# Altium PCB ABPG.PcbDoc
Units mm, origin at the board's own origin, x right, y up, seen from the top; angles counter-clockwise.
Board outline 62 x 60 mm, 4 copper layers (Top Layer, Layer 1, Layer 2, Bottom Layer), stack 0.603 mm thick; 85 components, 38 nets, 260 pads, 505 vias.
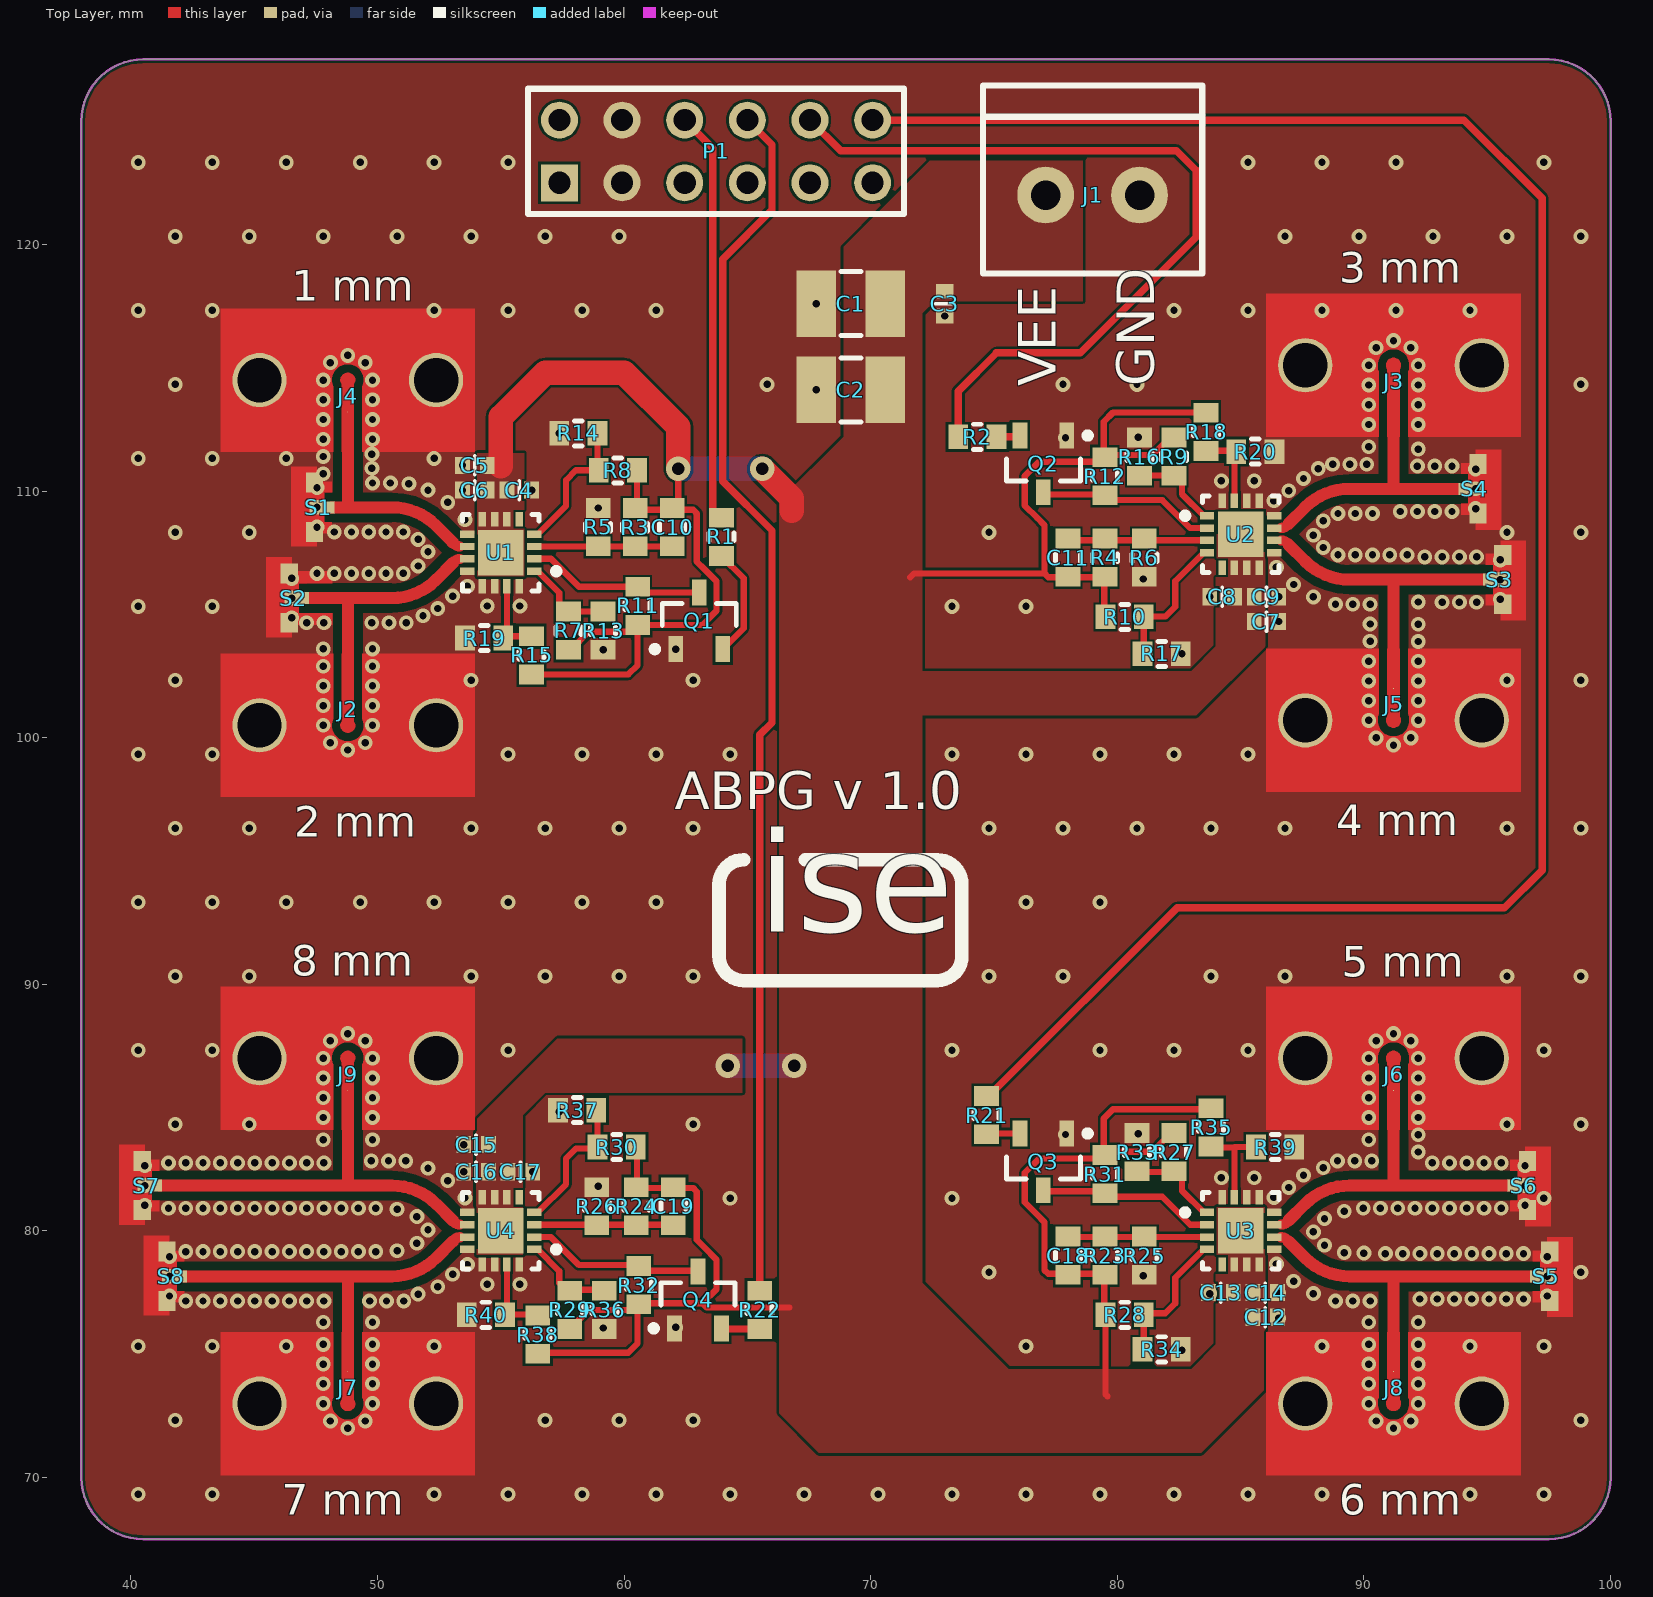
[diagram p0: Top Layer view]
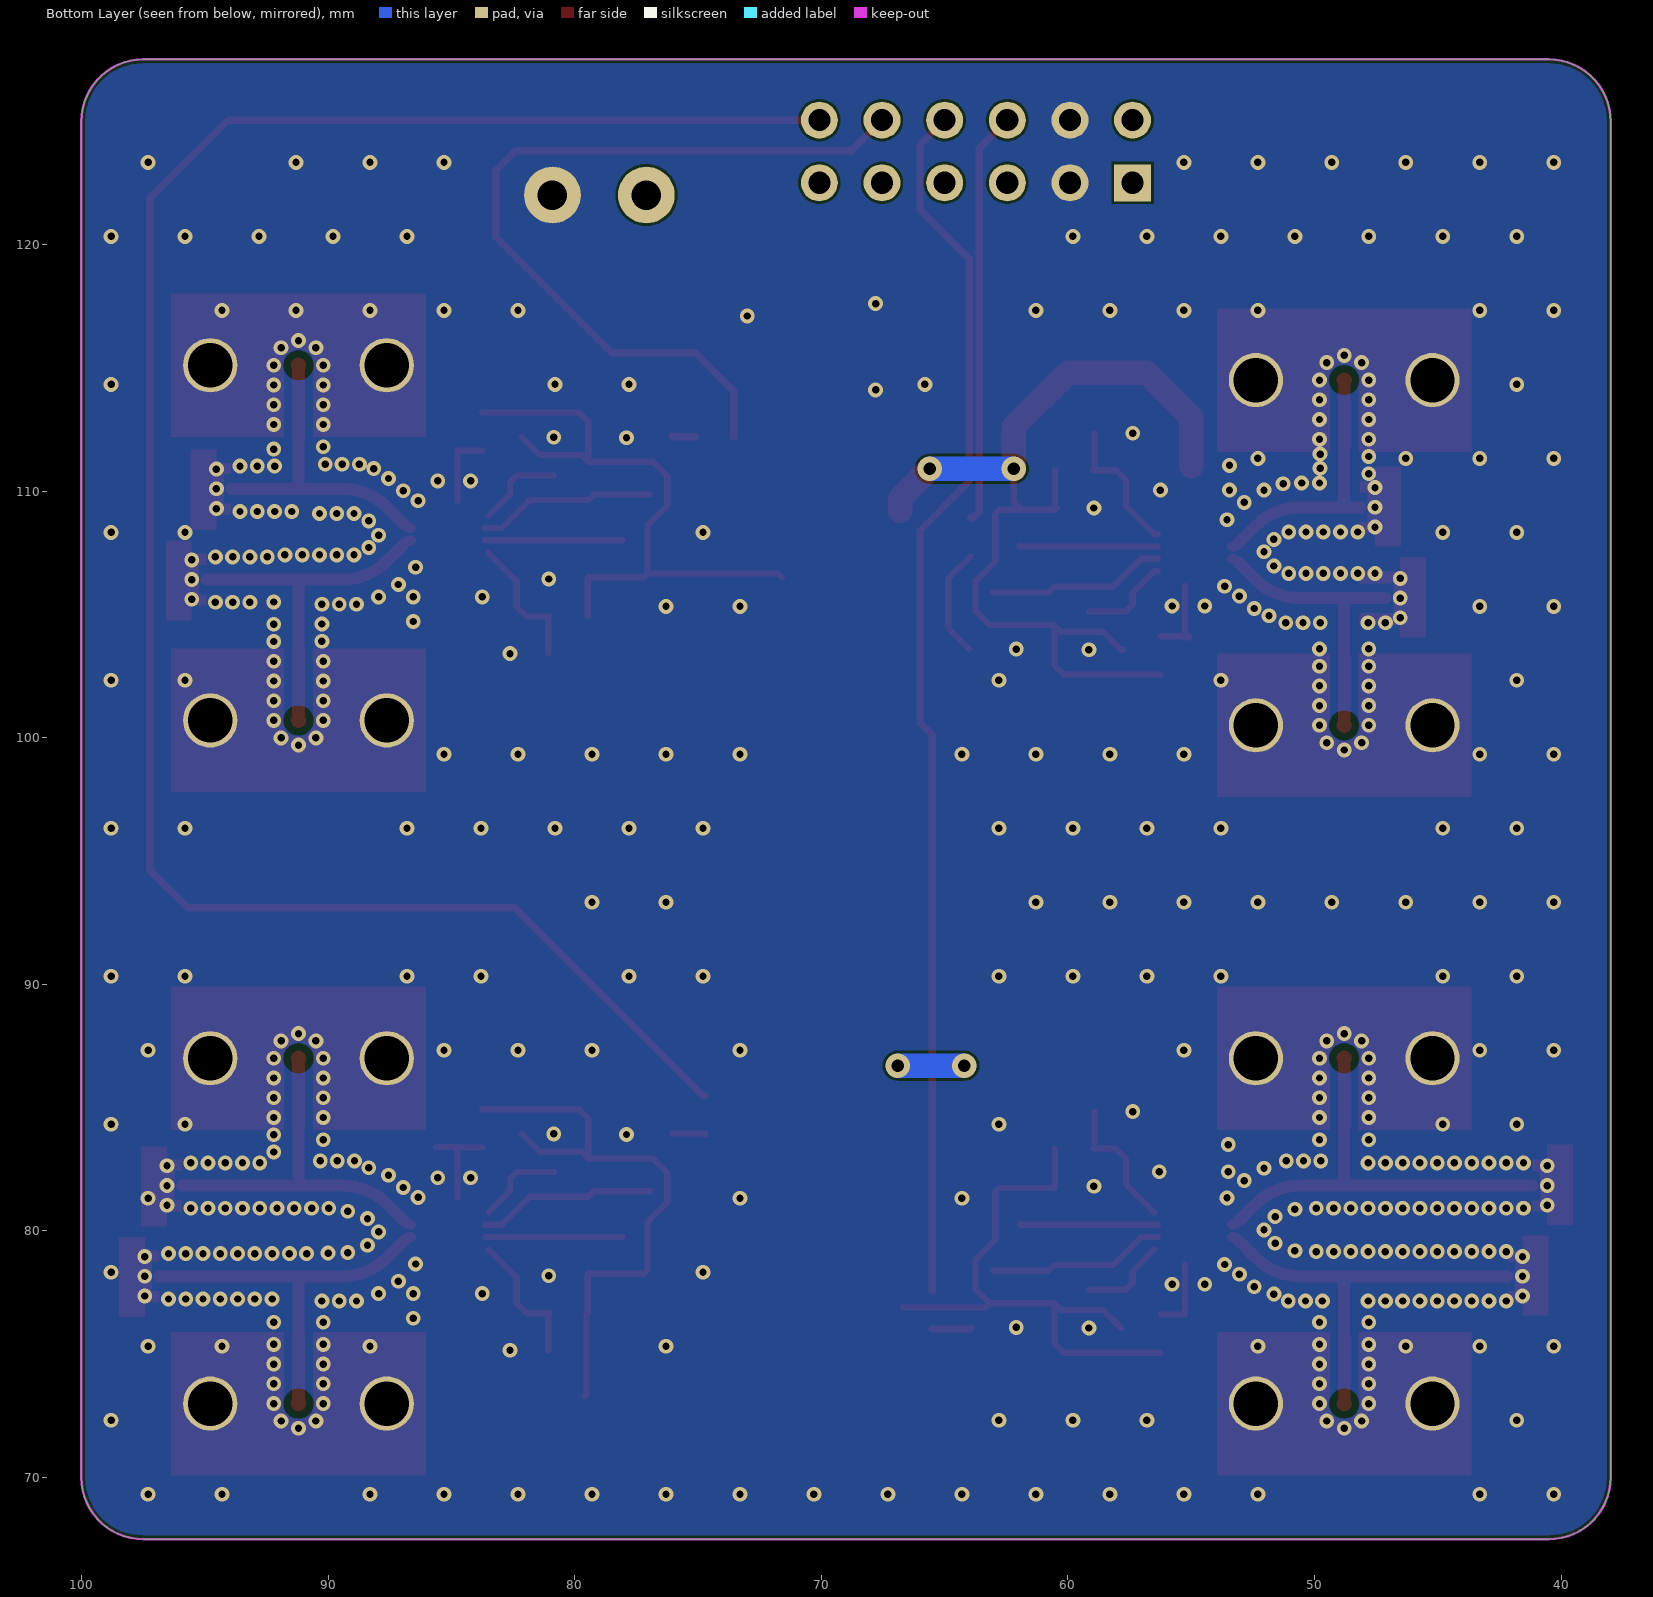
[diagram p1: Bottom Layer view, seen from below]
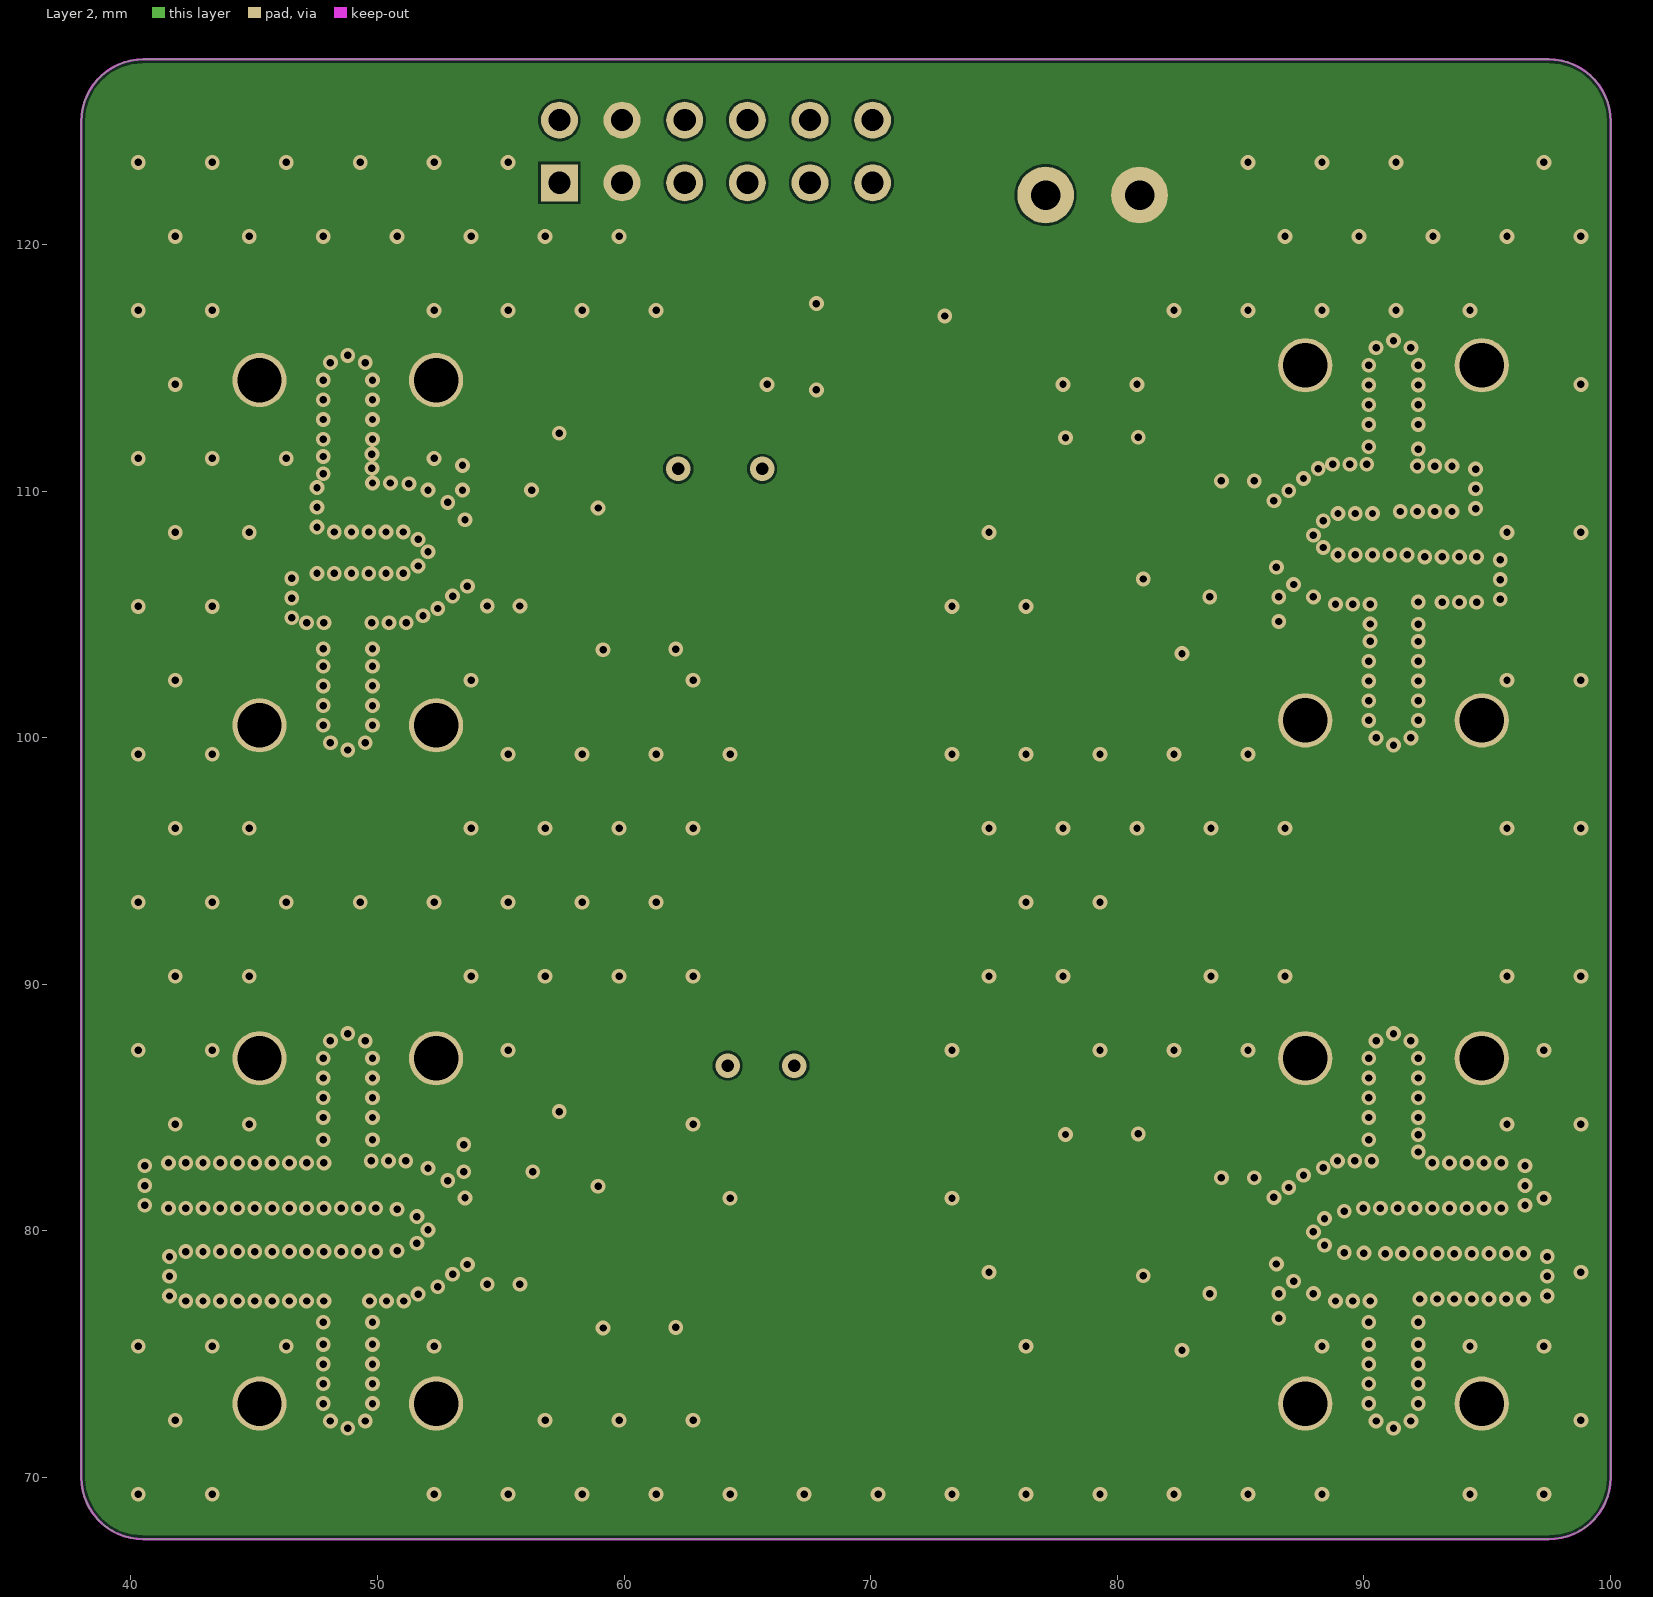
[diagram p2: Layer 2]
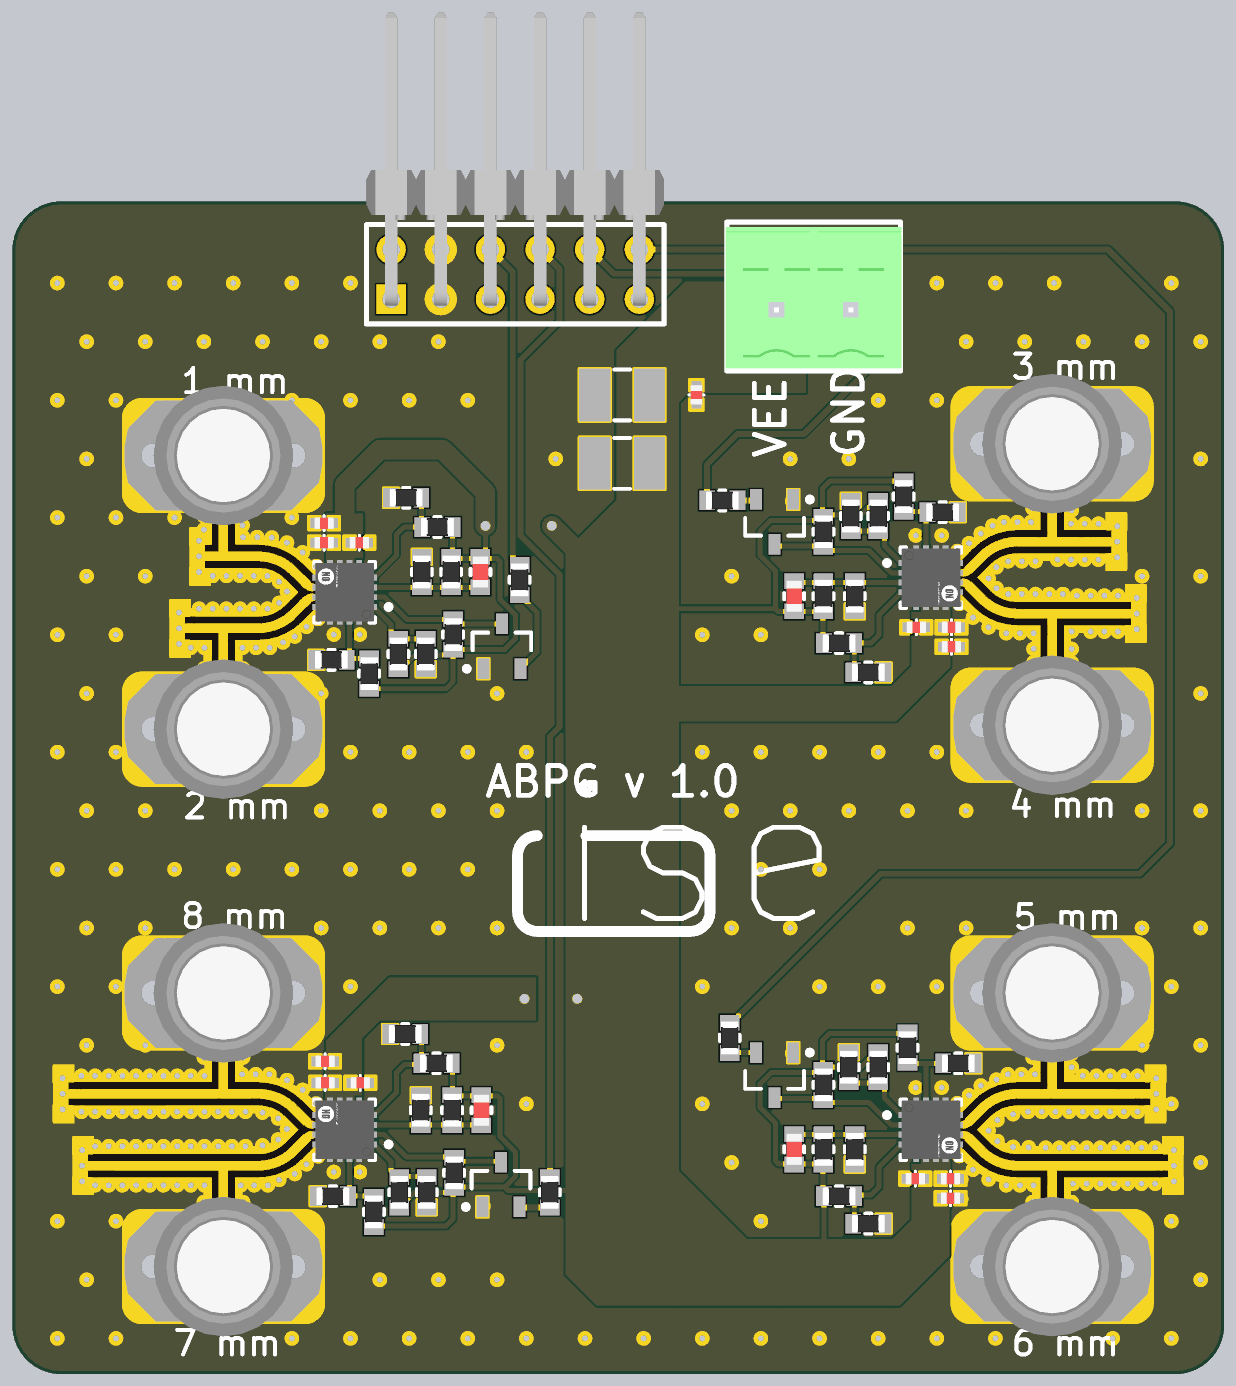
[diagram p3: 3D render of the assembled board from above, using the file's embedded part models]

## Layer stack, top to bottom
Top Solder: solder mask 0.0102, Solder Resist, Dk 3.5
Top Layer: signal copper 0.0356
Dielectric 2: prepreg 0.0711, PP-006, Dk 4.1
Layer 1: signal copper 0.035
Dielectric 1: dielectric 0.32, FR-4, Dk 4.8
Layer 2: signal copper 0.035
Dielectric 5: prepreg 0.0711, PP-006, Dk 4.1
Bottom Layer: signal copper 0.0356
Bottom Solder: solder mask 0.0102, Solder Resist, Dk 3.5

## Board outline
38,70 38,125 cw(c40.5,125) 40.5,127.5 97.5,127.5 cw(c97.5,125) 100,125 100,70 cw(c97.5,70) 97.5,67.5 40.5,67.5 cw(c40.5,70)

## Design rules (kind name [scope] priority, off if disabled: settings)
Clearance Clearance_50_50 [InNetClass('50 ohm') vs InNetClass('50 ohm')] p1: gap=0.1 ignorepadtopadclearanceinfootprint=FALSE
Clearance Clearance_50_U1U2U3U4 [InNetClass('50 ohm') vs (InComponent('U1') OR InComponent('U2') OR InComponent('U3')  OR InComponent('U4'))] p2: gap=0.1 ignorepadtopadclearanceinfootprint=FALSE
Clearance Clearance_50 [InNetClass('50 ohm')] p3: gap=0.34 ignorepadtopadclearanceinfootprint=FALSE
Clearance [All] p4: gap=0.1 ignorepadtopadclearanceinfootprint=FALSE
Clearance Clearance_1 [(InComponent('S1') Or InComponent('S2') Or InComponent('S3') Or InComponent('S4') Or InComponent('S5') Or InComponent('S6') Or InComponent('S7') Or InComponent('S8'))] p5: gap=0 ignorepadtopadclearanceinfootprint=FALSE
ComponentClearance [All] p1: gap=-100 collisioncheckmode=3 verticalgap=-100 showdistances=FALSE
MinimumAnnularRing [All] p1: minimumring=0.15
PolygonConnect [All] p1: connectstyle=Direct reliefconductorwidth=0.254 reliefentries=4 polygonreliefangle="90 Angle" airgapwidth=0.254
RoomDefinition ABPG_TOP [InComponentClass('ABPG_TOP')] p1: confinementstyle=ConfineOut formatcopy=TRUE lockcomponents=FALSE outline 177.673,0 633.476,0 633.476,18.923 177.673,18.923
RoutingVias [All] p1: holewidth=0.3 width=0.6 viastyle="Through Hole" minholewidth=0.3 minwidth=0.6 maxholewidth=0.3 maxwidth=100
ShortCircuit ShortCircuit_1 [(InComponent('S1') Or InComponent('S2') Or InComponent('S3') Or InComponent('S4') Or InComponent('S5') Or InComponent('S6') Or InComponent('S7') Or InComponent('S8'))] p1: allowed=TRUE
ShortCircuit [All] p2: allowed=FALSE
SolderMaskExpansion [All] p1: expansion=0.075 istentingtop=FALSE
SupplyNets "Schematic Supply Nets_1" [InNet('VEE')] p1: voltage=0.000
SupplyNets "Schematic Supply Nets" [InNet('GND')] p2: voltage=0.000
UnRoutedNet [All] p1: checkbadconnections=TRUE
Width Width_1 [InNetClass('50 ohm')] p1: maxlimit=0.49 minlimit=0.49 preferedwidth=0.49
Width [All] p2: maxlimit=100 minlimit=0.2 preferedwidth=0.5
27 further rules are at their usual default settings.

## Classes and differential pairs
net class "50 ohm": NetJ2_1 NetJ3_1 NetJ4_1 NetJ5_1 NetJ6_1 NetJ7_1 NetJ8_1 NetJ9_1

## Components (designator, comment, footprint, x,y, rotation, side; value= is the part's Value field where it differs from the comment)
C1 "22 uF" C1210 69.2,117.6 r180 top
C2 "22 uF" C1210 69.2,114.1 r180 top
C3 "100 nF" C0402 73,117.6 r270 top
C4 "100 nF" C0402 55.75,110.04 r0 top
C5 "1 nF" C0402 53.95,111.04 r180 top
C6 "100 pF" C0402 53.95,110.04 r180 top
C7 "100 nF" C0402 86.05,104.71 r0 top
C8 "1 nF" C0402 84.25,105.71 r180 top
C9 "100 pF" C0402 86.05,105.71 r0 top
C10 "100 nF" 0603-Capacitor 61.95,108.54 r270 top
C11 "100 nF" 0603-Capacitor 78,107.3 r90 top
C12 "100 nF" C0402 86,76.5 r0 top
C13 "1 nF" C0402 84.2,77.5 r180 top
C14 "100 pF" C0402 86,77.5 r0 top
C15 "100 nF" C0402 54,83.5 r180 top
C16 "1 nF" C0402 54,82.4 r180 top
C17 "100 pF" C0402 55.8,82.4 r0 top
C18 "100 nF" 0603-Capacitor 78,79 r90 top
C19 "100 nF" 0603-Capacitor 62,81 r270 top
J1 "1803426" 1803426 79,122 r180 top
J2 "SF1621-60026" SF1621-60026-RO4350-0.254 48.8,100.5 r180 top
J3 "SF1621-60026" SF1621-60026-RO4350-0.254 91.2,115.1 r0 top
J4 "SF1621-60026" SF1621-60026-RO4350-0.254 48.8,114.5 r0 top
J5 "SF1621-60026" SF1621-60026-RO4350-0.254 91.2,100.7 r180 top
J6 "SF1621-60026" SF1621-60026-RO4350-0.254 91.2,87 r0 top
J7 "SF1621-60026" SF1621-60026-RO4350-0.254 48.8,73 r180 top
J8 "SF1621-60026" SF1621-60026-RO4350-0.254 91.2,73 r180 top
J9 "SF1621-60026" SF1621-60026-RO4350-0.254 48.8,87 r0 top
P1 "PBC06DGAN" PBC06DGAN 57.38,122.5 r0 top
Q1 "BC857C" INF-SOT23_N 63.05,104.74 r90 top
Q2 "BC857C" INF-SOT23_N 77,111.1 r270 top
Q3 "BC857C" INF-SOT23_N 77,82.8 r270 top
Q4 "BC857C" INF-SOT23_N 63,77.2 r90 top
R1 "250r" 0603-Resistor 63.95,108.14 r90 top
R2 "250r" 0603-Resistor 74.325,112.2 r180 top
R3 "1k" 0603-Resistor 60.45,108.54 r90 top
R4 "1k" 0603-Resistor 79.5,107.3 r270 top
R5 "1k5" 0603-Resistor 58.95,108.54 r90 top
R6 "1k5" 0603-Resistor 81.1,107.3 r270 top
R7 "DNP" 0603-Resistor 57.75,104.34 r90 top
R8 "DNP" 0603-Resistor 59.75,110.84 r180 top
R9 "DNP" 0603-Resistor 82.3,111.4 r270 top
R10 "DNP" 0603-Resistor 80.3,104.9 r0 top
R11 "250r" 0603-Resistor 60.55,105.34 r270 top
R12 "250r" 0603-Resistor 79.5,110.6 r90 top
R13 "DNP" 0603-Resistor 59.15,104.34 r270 top
R14 "DNP" 0603-Resistor 58.15,112.34 r180 top
R15 "*" 0603-Resistor 56.25,103.34 r270 top
R16 "DNP" 0603-Resistor 80.9,111.4 r90 top
R17 "DNP" 0603-Resistor 81.8,103.4 r0 top
R18 "*" 0603-Resistor 83.6,112.4 r90 top
R19 "*" 0603-Resistor 54.325,104.04 r180 top
R20 "*" 0603-Resistor 85.6,111.6 r0 top
R21 "250r" 0603-Resistor 74.7,84.7 r90 top
R22 "250r" 0603-Resistor 65.5,76.8 r90 top
R23 "1k" 0603-Resistor 79.5,79 r270 top
R24 "1k" 0603-Resistor 60.5,81 r90 top
R25 "1k5" 0603-Resistor 81.1,79 r270 top
R26 "1k5" 0603-Resistor 58.9,81 r90 top
R27 "DNP" 0603-Resistor 82.3,83.2 r270 top
R28 "DNP" 0603-Resistor 80.3,76.6 r0 top
R29 "DNP" 0603-Resistor 57.8,76.8 r90 top
R30 "DNP" 0603-Resistor 59.7,83.4 r180 top
R31 "250r" 0603-Resistor 79.5,82.3 r90 top
R32 "250r" 0603-Resistor 60.6,77.8 r270 top
R33 "DNP" 0603-Resistor 80.8,83.2 r90 top
R34 "DNP" 0603-Resistor 81.8,75.2 r0 top
R35 "*" 0603-Resistor 83.8,84.2 r90 top
R36 "DNP" 0603-Resistor 59.2,76.8 r270 top
R37 "DNP" 0603-Resistor 58.1,84.9 r180 top
R38 "*" 0603-Resistor 56.5,75.8 r270 top
R39 "*" 0603-Resistor 86.4,83.4 r0 top
R40 "*" 0603-Resistor 54.4,76.6 r180 top
S1 "Short_RO4350" STD_SHORT 47.85,109.34 r270 top net-tie
S2 "Short_RO4350" STD_SHORT 46.83,105.66 r270 top net-tie
S3 "Short_RO4350" STD_SHORT 95.23,106.41 r90 top net-tie
S4 "Short_RO4350" STD_SHORT 94.23,110.09 r90 top net-tie
S5 "Short_RO4350" STD_SHORT 97.13,78.16 r90 top net-tie
S6 "Short_RO4350" STD_SHORT 96.23,81.84 r90 top net-tie
S7 "Short_RO4350" STD_SHORT 40.87,81.84 r270 top net-tie
S8 "Short_RO4350" STD_SHORT 41.87,78.16 r270 top net-tie
U1 "NB7V33MMNG" FP-485G-01-MFG 55,107.5 r180 top
U2 "NB7V33MMNG" FP-485G-01-MFG 85,108.25 r0 top
U3 "NB7V33MMNG" FP-485G-01-MFG 85,80 r0 top
U4 "NB7V33MMNG" FP-485G-01-MFG 55,80 r180 top

## Footprints (in the part's own frame and the unit in brackets; to place one, negate y for a bottom-side part, rotate by r counter-clockwise, add the part's x,y. Pads: shape width x height; smd on the part's side, far side on the other; paste and mask are expansions set on the pad)
0603-Capacitor [mm] "Chip Resistor, 2-Leads, Body 1,6x0,8mm, IPC Medium Density"
  rect 0.8x1 smd: 1(-0.775,0) 2(0.775,0)
  silkscreen extent -0.15,-0.51 0.15,0.51, body extent -0.8,-0.4 0.8,0.4, height 0.3
0603-Resistor [mm] "Chip Resistor, 2-Leads, Body 1,6x0,8mm, IPC Medium Density"
  rect 0.8x1 smd: 1(-0.775,0) 2(0.775,0)
  silkscreen extent -0.15,-0.51 0.15,0.51, body extent -0.85,-0.45 0.85,0.45, height 0.55
1803426 [mm]
  round 2.3 hole 1.2: 1(1.905,0) 2(-1.905,0)
  silkscreen extent -4.45,-4.45 4.45,3.18, body extent -4.5,-4.2 4.51,3.05, height 9.2
C0402 [mm] "Chip Capacitor, 2-Leads, Body 1,00x0,50mm, IPC Medium Density"
  rect 0.6x0.7 smd paste-0.1: 1(-0.5,0) 2(0.5,0)
  silkscreen extent 0,-0.38 0,0.38, body extent -0.5,-0.3 0.5,0.3, height 0.2
C1210 [mm]
  rect 1.6x2.7 smd: 1(-1.4,0) 2(1.4,0)
  silkscreen extent -0.4,-1.3 0.4,1.3, body extent -1.8,-1.25 1.8,1.25, height 2.3
FP-485G-01-MFG [mm]
  rect 0.58x0.3 smd paste+0 mask+0: 1(-1.36,0.75) 2(-1.36,0.25) 3(-1.36,-0.25) 4(-1.36,-0.75) 9(1.36,-0.75) 10(1.36,-0.25) 11(1.36,0.25) 12(1.36,0.75)
  rect 0.3x0.58 smd paste+0 mask+0: 5(-0.75,-1.36) 6(-0.25,-1.36) 7(0.25,-1.36) 8(0.75,-1.36) 13(0.75,1.36) 14(0.25,1.36) 15(-0.25,1.36) 16(-0.75,1.36)
  rect 1.84x1.84 smd paste+0 mask+0: 17(0,0)
  silkscreen extent -2.38,-1.55 1.55,1.55, body extent -1.75,-1.75 1.75,1.75, height 0.25
INF-SOT23_N [mm] "SOT23, 3-Leads, Body 2.9x1.3 mm, Pitch 0.95 mm, IPC Medium Density"
  rect 1.05x0.6 smd: 1(-1.15,0.95) 2(-1.15,-0.95) 3(1.15,0)
  silkscreen extent -1.27,-1.5 0.7,1.92, body extent -0.7,-1.5 0.7,1.5, height 1.1
PBC06DGAN [mm]
  rect 1.5x1.5 hole 0.9: 1(0,0)
  round 1.5 hole 0.9: 2(0,2.54) 3(2.54,0) 4(2.54,2.54) 5(5.08,0) 6(5.08,2.54) 7(7.62,0) 8(7.62,2.54) 9(10.16,0) 10(10.16,2.54) 11(12.7,0) 12(12.7,2.54)
  silkscreen extent -1.27,-1.27 13.97,3.81, body extent -1.27,-0.32 13.97,14.68, height 6.25
SF1621-60026-RO4350-0.254 [mm]
  round 2.2 hole 1.8 paste-2539.97 mask+0: 0(-3.58,0) 0(3.58,0)
  round 0.025 smd paste-2539.97 mask+0: 1(0,-1.3)
  Top Layer region: -0.245,-2.9 -0.245,-0.173 -0.245,-0.173 -0.297,-0.039 -0.281,0.105 -0.2,0.224 -0.072,0.291 0.072,0.291 0.2,0.224 0.281,0.105 0.297,-0.039 0.245,-0.173 0.245,-0.173 0.245,-2.9
  Top Layer region: -5.15,-2.9 -5.15,2.9 5.15,2.9 5.15,-2.9 0.595,-2.9 0.595,-0.262 0.648,0.053 0.544,0.355 0.31,0.572 0,0.65 -0.31,0.572 -0.544,0.355 -0.648,0.053 -0.595,-0.262 -0.595,-0.262 -0.595,-2.9
  Top Layer pour cut-out: -1.5,-2 -1.5,1.5 1.5,1.5 1.5,-2
  Bottom Layer pour cut-out: 0,-0.6 -0.23,-0.554 -0.424,-0.424 -0.554,-0.23 -0.6,0 -0.6,0 -0.554,0.23 -0.424,0.424 -0.23,0.554 0,0.6 0,0.6 0.23,0.554 0.424,0.424 0.554,0.23 0.6,0 0.6,0 0.554,-0.23 0.424,-0.424 0.23,-0.554 0,-0.6
  body extent -5.08,-3.57 5.08,3.57, height 11.2
STD_SHORT [mm]
  rect 0.81x0.7 smd paste-2539.97: 0(-1,-0.4) 0(1,-0.4)
  rect 0.49x1 smd paste-2539.97: 1(0,-0.1)
  Top Layer region: -1,-0.7 1,-0.7 1,0 -1,0

## Part data
C1 C2: library part Capacitor, "Capacitor", Package=1210
C3 C4 C5 C6 C7 C8 C9 C12 C13 C14 C15 C16 C17: library part Capacitor, "Capacitor", Package=0402
C10 C11 C18 C19: library part C0603, "Capacitor", Package=0603, Part Number=C0603, Pin Count=2
J1: "2 Position Terminal Block Header", Manufacturer="Phoenix Contact", Component Type=Standard, Footprint Type="Through hole", ManufacturerNr=1803426, Part Number=1803426, Pin Count=2
J2 J3 J4 J5 J6 J7 J8 J9: "CONN 2.4MM JACK STR 50OHM SCREW", Manufacturer=Amphenol, Component Type=Standard, Footprint Type=SMD, ManufacturerNr=SF1621-60026, Package=SF1621-60026, Part Number=SF1621-60026, Pin Count=2
P1: "Double-row jumper plug (female) 5x2", Manufacturer="Sullins Connector Solutions", Component Type=Standard, Footprint Type=THD, ManufacturerNr=PBC06DGAN, Package=PBC06DGAN, Part Number=PBC06DGAN, Pin Count=12
Q1 Q2 Q3 Q4: library part CMP-1177-00039-1, "PNP Silicon AF Transistor, 45 V VCEO, 100 mA IC, SOT23, Reel, Green", Manufacturer=Infineon, ComponentLink1Description="Manufacturer URL", ComponentLink1URL=http://www.infineon.com/, ComponentLink2Description=Datasheet, ComponentLink2URL=http://www.infineon.com/dgdl/bc857series_bc858series_bc859series_bc860series.pdf?folderId=db3a304314dca389011541d30fa21656&fileId=db3a304314dca389011541da0e3a1661, ComponentLink3Description="Package Specification", ComponentLink3URL=http://www.infineon.com/dgdl/SOT23-Package_Overview.pdf?folderId=db3a30431936bc4b0119532290053c66&fileId=db3a30431936bc4b0119533468123c85, fT (typ)="250Â MHz", Green=TRUE, IBM (max)="200Â mA", IC (max)="100Â mA", ICBO (max)="15Â nA", ICM (max)="200Â mA", Mounting Technology="Surface Mount", PackageDescription="3-Pin Small Outline Transistor Package, 1.3 x 2.9 mm Body, 0.95 mm Pitch", PackageReference=SOT23, PackageVersion=Apr-08, Packing=Reel, PartNumber=BC857C, Polarity=PNP, Ptot (max)="330Â mW", VCBO (max)="50Â V", VCEO (max)="45Â V", VEBO (max)="5Â V"
R1 R2 R3 R4 R5 R6 R7 R8 R9 R10 R11 R12 R13 R14 R15 R16 R17 R18 R19 R20 R21 R22 R23 R24 R25 R26 R27 R28 R29 R30 R31 R32 R33 R34 R35 R36 R37 R38 R39 R40: library part R0603, "Resistor", Package=0603, Part Number=R0603, Pin Count=2
U1 U2 U3 U4: library part CMP-07066-000001-1, "IC CLK DIVIDER 1:1 10GHZ 16QFN", Ambient Temperature Range High=+85°C, Ambient Temperature Range Low=-40°C, Manufacturer="ON Semiconductor", Max Supply Voltage=2.625V, Min Supply Voltage=1.71V, Nominal Supply Current=85-95mA, Package=485G-01, Temperature="-40°C to +85°C", Automotive=No, Category=IC, ComponentLink2Description=Datasheet, ComponentLink2URL=https://www.onsemi.com/pub/Collateral/NB7V33M-D.PDF, Device Class L1="Integrated Circuits (ICs)", Device Class L2="Clock and Timing", Device Class L3=Drivers, Digikey Description="IC CLK DIVIDER 1:1 10GHZ 16QFN", Footprint Url=https://www.onsemi.com/pub/Collateral/485G-01.PDF, Height=1mm, Ipc Land Pattern Name=QFN50P300X300X90-16, Lead Free=Yes, Manufacturer Part Number=NB7V33MMNG, Mouser Description="Clock Drivers & Distribution 1.8V / 2.5V 10GHz", Number Of Elements=1, Number Of Inputs=1, Number of Outputs=1, Octopart=https://octopart.com/nb7v33mmng-on+semiconductor-15753900, Propagation Delay=0.26ns, RoHS=TRUE, Standoff Height=0mm, Temperature Range High=+85°C, Temperature Range Low=-40°C

## Via types
v1: diameter 0.6, hole 0.3, Top Layer to Bottom Layer, 501 vias
v2: diameter 1, hole 0.5, Top Layer to Bottom Layer, tented both sides, 4 vias

## Nets (pads, with @x,y where several pads share a name; then routed paths per layer and width w, separated by ;. In a path a pad name is that pad's centre, name@x,y a point inside that pad or via, vN(x,y) a via of type N, cw(c..) or ccw(c..) an arc to the next point about the centre after c; other vN are vias at no path point)
GND: C1.2 C2.2 C3.2 C4.2 C5.2 C6.2 C7.2 C8.2 C9.2 C12.2 C13.2 C14.2 C15.2 C16.2 C17.2 J1.2 J2.0 J3.0 J4.0 J5.0 J6.0 J7.0 J8.0 J9.0 P1.3 P1.4 Q1.1 Q2.1 Q3.1 Q4.1 R5.2 R6.2 R13.2 R14.2 R16.2 R17.2 R19.2 R20.2 R25.2 R26.2 R33.2 R34.2 R36.2 R37.2 R39.2 R40.2 S1.0 S2.0 S3.0 S4.0 S5.0 S6.0 S7.0 S8.0 U1.9 U1.12 U1.13 U1.14 U1.16 U2.9 U2.12 U2.13 U2.14 U2.16 U3.9 U3.12 U3.13 U3.14 U3.16 U4.9 U4.12 U4.13 U4.14 U4.16
  other v1: 40.3,69.325 43.3,69.325 52.3,69.325 55.3,69.325 58.3,69.325 61.3,69.325 64.3,69.325 67.3,69.325 70.3,69.325 73.3,69.325 76.3,69.325 79.3,69.325 82.3,69.325 85.3,69.325 88.3,69.325 94.3,69.325 97.3,69.325 48.8,72 91.2,72 48.093,72.293 49.507,72.293 90.493,72.293 91.907,72.293 41.8,72.325 56.8,72.325 59.8,72.325 62.8,72.325 98.8,72.325 47.8,73 49.8,73 90.2,73 92.2,73 47.8,73.8 49.8,73.8 90.2,73.8 92.2,73.8 47.8,74.6 49.8,74.6 90.2,74.6 92.2,74.6 82.625,75.16 40.3,75.325 43.3,75.325 46.3,75.325 52.3,75.325 76.3,75.325 88.3,75.325 94.3,75.325 97.3,75.325 47.8,75.4 49.8,75.4 90.2,75.4 92.2,75.4 59.15,76.065 62.1,76.09 47.8,76.3 49.8,76.3 90.2,76.3 92.2,76.3 86.55,76.46 42.23,77.16 42.93,77.16 43.63,77.16 44.33,77.16 45.03,77.16 45.73,77.16 46.43,77.16 47.13,77.16 47.83,77.16 49.685,77.16 50.37,77.16 51.07,77.16 88.85,77.16 89.55,77.16 90.25,77.16 92.27,77.24 92.97,77.24 93.67,77.24 94.37,77.24 95.07,77.24 95.77,77.24 96.47,77.24 41.57,77.36 97.43,77.36 51.65,77.44 83.75,77.46 86.55,77.46 87.95,77.46 52.45,77.74 54.45,77.84 55.777,77.84 87.15,77.96 41.57,78.16 97.43,78.16 81.05,78.185 53.05,78.24 74.8,78.325 98.8,78.325 53.65,78.64 86.45,78.66 41.57,78.96 97.43,78.96 90.87,79.08 91.57,79.08 92.27,79.08 92.97,79.08 93.67,79.08 94.37,79.08 95.07,79.08 95.77,79.08 96.47,79.08 90,79.1 89.2,79.12 42.23,79.16 42.93,79.16 43.63,79.16 44.33,79.16 45.03,79.16 45.73,79.16 46.43,79.16 47.13,79.16 47.83,79.16 48.53,79.16 49.23,79.16 49.93,79.16 50.8,79.2 88.4,79.42 51.6,79.5 87.95,79.96 52.05,80.04 88.4,80.5 51.6,80.58 89.2,80.8 50.8,80.88 41.53,80.92 42.23,80.92 42.93,80.92 43.63,80.92 44.33,80.92 45.03,80.92 45.73,80.92 46.43,80.92 47.13,80.92 47.83,80.92 48.53,80.92 49.23,80.92 49.93,80.92 89.97,80.92 90.67,80.92 91.37,80.92 92.07,80.92 92.77,80.92 93.47,80.92 94.17,80.92 94.87,80.92 95.57,80.92 40.57,81.04 96.53,81.04 53.55,81.34 64.3,81.325 73.3,81.325 97.3,81.325 86.35,81.36 86.95,81.76 58.95,81.815 40.57,81.84 96.53,81.84 52.85,82.04 84.223,82.16 85.55,82.16 87.55,82.26 53.5,82.4 56.3,82.4 52.05,82.54 88.35,82.56 40.57,82.64 96.53,82.64 41.53,82.76 42.23,82.76 42.93,82.76 43.63,82.76 44.33,82.76 45.03,82.76 45.73,82.76 46.43,82.76 47.13,82.76 47.83,82.76 92.77,82.76 93.47,82.76 94.17,82.76 94.87,82.76 95.57,82.76 49.75,82.84 50.45,82.84 51.15,82.84 88.93,82.84 89.63,82.84 90.315,82.84 92.2,83.2 53.5,83.5 47.8,83.7 49.8,83.7 90.2,83.7 92.2,83.9 77.9,83.91 80.85,83.935 41.8,84.325 44.8,84.325 62.8,84.325 95.8,84.325 98.8,84.325 47.8,84.6 49.8,84.6 90.2,84.6 92.2,84.6 57.375,84.84 47.8,85.4 49.8,85.4 90.2,85.4 92.2,85.4 47.8,86.2 49.8,86.2 90.2,86.2 92.2,86.2 47.8,87 49.8,87 90.2,87 92.2,87 40.3,87.325 43.3,87.325 55.3,87.325 73.3,87.325 79.3,87.325 82.3,87.325 85.3,87.325 97.3,87.325 48.093,87.707 49.507,87.707 90.493,87.707 91.907,87.707 48.8,88 91.2,88 41.8,90.325 44.8,90.325 53.8,90.325 56.8,90.325 59.8,90.325 62.8,90.325 74.8,90.325 77.8,90.325 83.8,90.325 86.8,90.325 95.8,90.325 98.8,90.325 40.3,93.325 43.3,93.325 46.3,93.325 49.3,93.325 52.3,93.325 55.3,93.325 58.3,93.325 61.3,93.325 76.3,93.325 79.3,93.325 41.8,96.325 44.8,96.325 53.8,96.325 56.8,96.325 59.8,96.325 62.8,96.325 74.8,96.325 77.8,96.325 80.8,96.325 83.8,96.325 86.8,96.325 95.8,96.325 98.8,96.325 40.3,99.325 43.3,99.325 55.3,99.325 58.3,99.325 61.3,99.325 64.3,99.325 73.3,99.325 76.3,99.325 79.3,99.325 82.3,99.325 85.3,99.325 48.8,99.5 91.2,99.7 48.093,99.793 49.507,99.793 90.493,99.993 91.907,99.993 47.8,100.5 49.8,100.5 90.2,100.7 92.2,100.7 47.8,101.3 49.8,101.3 90.2,101.5 92.2,101.5 47.8,102.1 49.8,102.1 90.2,102.3 92.2,102.3 41.8,102.325 53.8,102.325 62.8,102.325 95.8,102.325 98.8,102.325 47.8,102.9 49.8,102.9 90.2,103.1 92.2,103.1 82.625,103.41 59.15,103.565 62.1,103.59 47.8,103.6 49.8,103.6 90.25,103.91 92.2,103.9 92.2,104.6 90.25,104.61 47.13,104.66 47.83,104.66 49.77,104.66 50.47,104.66 51.17,104.66 86.55,104.71 46.53,104.86 51.85,104.94 52.45,105.24 40.3,105.325 43.3,105.325 54.45,105.34 55.777,105.34 73.3,105.325 76.3,105.325 88.85,105.41 89.55,105.41 90.25,105.41 93.17,105.49 93.87,105.49 94.57,105.49 92.2,105.5 95.53,105.61 46.53,105.66 83.75,105.71 86.55,105.71 87.95,105.71 53.05,105.74 53.65,106.14 87.15,106.21 95.53,106.41 81.05,106.435 46.53,106.46 47.55,106.66 48.25,106.66 48.95,106.66 49.65,106.66 50.35,106.66 51.05,106.66 86.45,106.91 51.65,106.96 95.53,107.21 92.47,107.33 93.17,107.33 93.87,107.33 94.57,107.33 88.95,107.41 89.65,107.41 90.35,107.41 91.05,107.41 91.75,107.41 52.05,107.54 88.35,107.71 51.65,108.04 87.95,108.21 41.8,108.325 44.8,108.325 48.25,108.34 48.95,108.34 49.65,108.34 50.35,108.34 51.05,108.34 74.8,108.325 95.8,108.325 98.8,108.325 47.55,108.54 88.35,108.79 53.55,108.84 88.95,109.09 89.65,109.09 90.35,109.09 91.47,109.17 92.17,109.17 92.87,109.17 93.57,109.17 94.53,109.29 58.95,109.315 47.55,109.34 52.85,109.54 86.35,109.61 86.95,110.01 52.05,110.04 53.45,110.04 56.25,110.04 94.53,110.09 47.55,110.14 51.275,110.3 49.8,110.325 50.525,110.325 84.223,110.41 85.55,110.41 87.55,110.51 47.8,110.7 94.53,110.89 49.775,110.925 88.15,110.91 92.17,111.01 92.87,111.01 93.57,111.01 53.45,111.04 88.73,111.09 89.43,111.09 90.115,111.09 40.3,111.325 43.3,111.325 46.3,111.325 52.3,111.325 47.8,111.4 49.775,111.5 92.2,111.7 90.2,111.8 47.8,112.1 49.8,112.1 77.9,112.16 80.85,112.185 57.375,112.34 90.2,112.7 92.2,112.7 47.8,112.9 49.8,112.9 90.2,113.5 92.2,113.5 47.8,113.7 49.8,113.7 67.8,114.1 90.2,114.3 92.2,114.3 41.8,114.325 65.8,114.325 77.8,114.325 80.8,114.325 98.8,114.325 47.8,114.5 49.8,114.5 90.2,115.1 92.2,115.1 48.093,115.207 49.507,115.207 48.8,115.5 90.493,115.807 91.907,115.807 91.2,116.1 73,117.1 40.3,117.325 43.3,117.325 52.3,117.325 55.3,117.325 58.3,117.325 61.3,117.325 82.3,117.325 85.3,117.325 88.3,117.325 91.3,117.325 94.3,117.325 67.8,117.6 41.8,120.325 44.8,120.325 47.8,120.325 50.8,120.325 53.8,120.325 56.8,120.325 59.8,120.325 86.8,120.325 89.8,120.325 92.8,120.325 95.8,120.325 98.8,120.325 40.3,123.325 43.3,123.325 46.3,123.325 49.3,123.325 52.3,123.325 55.3,123.325 85.3,123.325 88.3,123.325 91.3,123.325 97.3,123.325
NetC10_2: C10.2 R3.1 R5.1 U1.3 | length 5.6
  Top Layer w0.254: U1.3 61.935,107.75 C10.2
NetC11_2: C11.2 R4.1 R6.1 U2.3 | length 5.6
  Top Layer w0.254: C11.2@78.065,108 U2.3
NetC18_2: C18.2 R23.1 R25.1 U3.3 | length 5.6
  Top Layer w0.254: C18.2@78.065,79.75 79.5,79.75 81.1,79.75 U3.3
NetC19_2: C19.2 R24.1 R26.1 U4.3 | length 5.6
  Top Layer w0.254: U4.3 C19.2@61.935,80.25
NetJ2_1: J2.1 S2.1 U1.11 | length 8.9
  Top Layer w0.41: 53.055,107.079 cw(c53.35,106.9) U1.11@53.35,107.245
  Top Layer w0.49: S2.1@47.125,105.66 50.584,105.66 ccw(c50.584,108.2) 52.38,106.404 53.055,107.079 ; 48.8,103.4 48.8,105.5
NetJ3_1: J3.1 S4.1 U2.11 | length 11.3
  Top Layer w0.41: 86.65,108.505 ccw(c86.65,108.85) 86.945,108.671
  Top Layer w0.49: 86.945,108.671 87.62,109.346 cw(c89.416,107.55) 89.416,110.09 91.23,110.09 ; 91.2,113.6 91.2,110.12 91.23,110.09 ; S4.1@93.93,110.09 91.23,110.09
NetJ4_1: J4.1 S1.1 U1.10 | length 8.3
  Top Layer w0.41: 53.055,107.921 ccw(c53.35,108.1) U1.10@53.35,107.755
  Top Layer w0.49: S1.1@48.15,109.34 48.75,109.34 48.8,109.39 48.8,111.89 ; 48.77,109.34 50.584,109.34 cw(c50.584,106.8) 52.38,108.596 53.055,107.921
NetJ5_1: J5.1 S3.1 U2.10 | length 13.6
  Top Layer w0.41: 86.65,107.995 cw(c86.65,107.65) 86.945,107.829
  Top Layer w0.49: 86.945,107.829 87.62,107.154 ccw(c89.416,108.95) 89.416,106.41 91.23,106.41 ; 91.2,101.6 J5.1 91.2,106.38 91.23,106.41 ; S3.1@94.93,106.41 91.23,106.41
NetJ6_1: J6.1 S6.1 U3.11 | length 12.7
  Top Layer w0.41: 86.65,80.255 ccw(c86.65,80.6) 86.945,80.421
  Top Layer w0.49: 86.945,80.421 87.62,81.096 cw(c89.416,79.3) 89.416,81.84 91.23,81.84 ; 91.2,84.7 91.2,81.87 91.23,81.84 ; S6.1@95.93,81.84 91.23,81.84
NetJ7_1: J7.1 S8.1 U4.11 | length 14.3
  Top Layer w0.41: 53.055,79.579 cw(c53.35,79.4) U4.11@53.35,79.745
  Top Layer w0.49: S8.1@42.17,78.16 48.77,78.16 ; 48.8,75.6 48.8,78.13 48.77,78.16 ; 53.055,79.579 52.38,78.904 cw(c50.584,80.7) 50.584,78.16 48.77,78.16
NetJ8_1: J8.1 S5.1 U3.10 | length 13.5
  Top Layer w0.41: 86.65,79.745 cw(c86.65,79.4) 86.945,79.579
  Top Layer w0.49: 86.945,79.579 87.62,78.904 ccw(c89.416,80.7) 89.416,78.16 91.23,78.16 ; 91.2,75.4 91.2,78.13 91.23,78.16 ; S5.1@96.83,78.16 91.23,78.16
NetJ9_1: J9.1 S7.1 U4.10 | length 15.4
  Top Layer w0.41: 53.055,80.421 ccw(c53.35,80.6) U4.10@53.35,80.255
  Top Layer w0.49: S7.1@41.17,81.84 48.77,81.84 ; 48.8,84.5 48.8,81.87 48.77,81.84 ; 53.055,80.421 52.38,81.096 ccw(c50.584,79.3) 50.584,81.84 48.77,81.84
NetQ1_2: Q1.2 R1.1 | length 4.5
  Top Layer w0.254: R1.1 64.85,106.465 64.85,104.44 Q1.2
NetQ1_3: Q1.3 R11.1 U1.2 | length 7.3
  Top Layer w0.254: U1.2 57.04,107.25 58.175,106.115 R11.1 60.775,105.89 Q1.3
NetQ2_2: Q2.2 R2.1 | length 1
  Top Layer w0.3: R2.1 76,112.2 Q2.2
NetQ2_3: Q2.3 R12.1 U2.2 | length 7.3
  Top Layer w0.254: Q2.3@76.95,109.86 79.225,109.86 79.45,109.635 81.825,109.635 82.96,108.5 U2.2
NetQ3_2: Q3.2 R21.1 | length 1.4
  Top Layer w0.254: R21.1 74.725,83.95 Q3.2
NetQ3_3: Q3.3 R31.1 U3.2 | length 7.3
  Top Layer w0.254: Q3.3@76.95,81.61 79.225,81.61 79.45,81.385 81.825,81.385 82.96,80.25 U3.2
NetQ4_2: Q4.2 R22.1 | length 1.6
  Top Layer w0.3: Q4.2 63.975,76.025 R22.1
NetQ4_3: Q4.3 R32.1 U4.2 | length 7.3
  Top Layer w0.254: U4.2 57.04,79.75 58.175,78.615 60.55,78.615 60.775,78.39 Q4.3@63.05,78.39
NetR15_1: R15.1 R19.1 U1.15 | length 3.3
  Top Layer w0.254: R19.1 55.1,104.115 R19.1@55.25,104.115 ; U1.15 R19.1@55.25,104.115 ; R15.1 R19.1@55.25,104.115
NetR18_1: R18.1 R20.1 U2.15 | length 3
  Top Layer w0.254: R18.1@83.75,111.635 84.75,111.635 U2.15
NetR35_1: R35.1 R39.1 U3.15 | length 3.9
  Top Layer w0.254: R35.1@83.75,83.385 84.75,83.385 ; U3.15 84.75,83.385 ; R39.1 84.765,83.4 84.75,83.385
NetR38_1: R38.1 R40.1 U4.15 | length 3
  Top Layer w0.254: U4.15 55.25,76.615 R38.1@56.25,76.615
PULSE_DRIVE_1: P1.6 R1.2 | length 16.8
  Top Layer w0.3: P1.6 63.6,123.9 63.6,109.165 63.85,108.915 R1.2
PULSE_DRIVE_2: P1.8 R22.2 | length 49.7
  Top Layer w0.3: P1.8 66,124.04 66,121.4 64,119.4 64,110.4 66,108.4 66,100.613 65.5,100.113 R22.2
PULSE_DRIVE_3: P1.10 R2.2 | length 33.3
  Top Layer w0.3: P1.10 68.78,123.8 82.4,123.8 83.2,123 83.2,120.3 78.5,115.6 75.1,115.6 73.55,114.05 R2.2
PULSE_DRIVE_4: P1.12 R21.2 | length 82
  Top Layer w0.3: P1.12 94.06,125.04 97.225,121.875 97.225,94.625 95.7,93.1 82.425,93.1 74.8,85.475 R21.2
VEE: C1.1 C2.1 C3.1 C4.1 C5.1 C6.1 C7.1 C8.1 C9.1 C10.1 C11.1 C12.1 C13.1 C14.1 C15.1 C16.1 C17.1 C18.1 C19.1 J1.1 R3.2 R4.2 R7.1 R8.1 R9.1 R10.1 R11.2 R12.2 R15.2 R18.2 R23.2 R24.2 R27.1 R28.1 R29.1 R30.1 R31.2 R32.2 R35.2 R38.2 U1.6 U1.7 U1.8 U1.17 U2.6 U2.7 U2.8 U2.17 U3.6 U3.7 U3.8 U3.17 U4.6 U4.7 U4.8 U4.17 | length 118.7
  Top Layer w0.254: R38.2@56.25,75.065 60.175,75.065 60.55,75.44 R32.2@60.55,77.065 ; R15.2 60.175,102.565 60.55,102.94 R11.2 ; R7.1 57.85,103.565 58.577,104.292 60.277,104.292 R11.2 ; R29.1@57.85,76.065 58.577,76.792 60.277,76.792 R32.2@60.55,77.065 ; R24.2@60.525,81.74 62.801,81.74 62.95,81.591 62.95,79.64 63.25,79.34 63.75,78.84 63.75,77.64 63.175,77.065 ; R24.2@60.525,81.89 R30.1@60.525,83.34 ; R8.1 60.525,109.39 R3.2 60.525,109.24 62.801,109.24 62.95,109.091 62.95,107.14 63.25,106.84 63.75,106.34 63.75,105.14 63.175,104.565 R11.2 ; C10.1 62.2,109.565 v2(62.2,110.9) ; 66.7,76.9 63.34,76.9 63.175,77.065 ; 71.6,106.5 71.759,106.659 77.05,106.659 ; R28.1@79.475,76.66 R23.2@79.475,78.11 ; R23.2@79.475,78.26 77.199,78.26 77.05,78.409 77.05,80.36 76.75,80.66 76.25,81.16 76.25,82.36 76.825,82.935 R31.2@79.45,82.935 ; R10.1@79.475,104.91 R4.2@79.475,106.36 ; R4.2@79.475,106.51 77.199,106.51 77.05,106.659 ; R28.1 79.525,73.375 79.6,73.3 ; R27.1@82.15,83.935 81.423,83.208 79.723,83.208 R31.2@79.45,82.935 ; R9.1@82.15,112.185 81.423,111.458 79.723,111.458 R12.2@79.45,111.185 ; R35.2@83.75,84.935 79.825,84.935 79.45,84.56 R31.2@79.45,82.935 ; R18.2@83.75,113.185 79.825,113.185 79.45,112.81 R12.2@79.45,111.185 ; R32.2@60.55,77.065 63.175,77.065 ; 77.05,106.659 77.05,108.61 76.75,108.91 76.25,109.41 76.25,110.61 76.825,111.185 R12.2@79.45,111.185
  Top Layer w1: 55,111 55,113 56.8,114.8 60,114.8 62.2,112.6 v2(62.2,110.9) ; v2(65.6,110.9) 66.8,109.7 66.8,109.2
  Bottom Layer w1: v2(62.2,110.9) v2(65.6,110.9) ; v2(64.2,86.7) v2(66.9,86.7)
VT1_N: R8.2 R14.1 U1.4 | length 5.8
  Top Layer w0.254: U1.4 56.5,108.25 57.65,109.4 57.65,110.44 58.05,110.84 R8.2 58.925,110.89 R14.1
VT1_P: R7.2 R13.1 U1.1 | length 3.8
  Top Layer w0.254: U1.1 56.5,106.75 57.377,105.873 57.377,105.388 57.65,105.115 R7.2 R13.1
VT2_N: R10.2 R17.1 U2.4 | length 5.6
  Top Layer w0.254: R10.2@81.025,104.91 81.95,104.91 82.35,105.31 82.35,106.35 U2.4@83.5,107.5 ; R17.1@81.075,103.41 R10.2@81.075,104.86
VT2_P: R9.2 R16.1 U2.1 | length 3.6
  Top Layer w0.254: R16.1@80.85,110.635 82.25,110.635 82.35,110.635 82.623,110.362 82.623,109.877 U2.1@83.5,109
VT3_N: R28.2 R34.1 U3.4 | length 5.6
  Top Layer w0.254: R28.2@81.025,76.66 81.95,76.66 82.35,77.06 82.35,78.1 U3.4@83.5,79.25 ; R34.1@81.075,75.16 R28.2@81.075,76.61
VT3_P: R27.2 R33.1 U3.1 | length 3.6
  Top Layer w0.254: R33.1@80.85,82.385 82.25,82.385 82.35,82.385 82.623,82.112 82.623,81.627 U3.1@83.5,80.75
VT4_N: R30.2 R37.1 U4.4 | length 5.6
  Top Layer w0.254: U4.4@56.5,80.75 57.65,81.9 57.65,82.94 58.05,83.34 R30.2@58.975,83.34 ; R30.2@58.925,83.39 R37.1@58.925,84.84
VT4_P: R29.2 R36.1 U4.1 | length 3.6
  Top Layer w0.254: U4.1@56.5,79.25 57.377,78.373 57.377,77.888 57.65,77.615 57.75,77.615 R36.1@59.15,77.615
pads on no net: P1.1 P1.2 P1.5 P1.7 P1.9 P1.11 U1.5 U2.5 U3.5 U4.5

## Polygon pours and split planes (outlines as drawn)
GND on Top Layer "GND_L01_P006" (solid, pour order 6): 38,127.5 38,67.5 100,67.5 100,127.5
VEE on Top Layer "VEE_L01_P005" (solid, pour order 5): 54,78.98 55.9,78.98 55.9,84.7 56.8,85.6 64.8,85.6 64.8,87.8 57.3,87.8 54,84.5
VEE on Top Layer "VEE_L01_P004" (solid, pour order 4): 86,108.25 86,103.7 83.2,100.9 70.3,100.9 70.3,102.7 83,102.7 84,103.7 84,108.25
VEE on Top Layer "VEE_L01_P003" (solid, pour order 3): 78.6,123.4 72.4,123.4 68.9,119.9 68.9,112.2 66.3,109.6 66.3,72.6 67.9,71 83.4,71 86,73.6 86,81.02 84,81.02 84,75.4 83,74.4 75.6,74.4 72.1,77.9 72.1,117.2 72.6,117.7 78.6,117.7
VEE on Top Layer "VEE_L01_P002" (solid, pour order 2): 55.95,111.54 54.05,111.54 54.05,106.54 55.95,106.54
GND on Bottom Layer "GND_L04_P007" (solid, pour order 7): 38,127.5 38,67.5 100,67.5 100,127.5
GND on Layer 2 "GND_L03_P009" (solid, pour order 9): 38,127.5 100,127.5 100,67.5 38,67.5

## Keep-outs
Keep-Out Layer:
  the board outline again, w0.1

## Other copper
Top Layer:
  rectangle net GND: 46.5,107.75 47.55,111
  rectangle net GND: 46.47,106.256 48.174,106.76
  rectangle net GND: 39.52,80.25 40.57,83.5
  rectangle net GND: 95.93,80.786 96.36,81.244
  rectangle net GND: 94.93,105.356 95.36,105.814
  rectangle net GND: 96.83,77.106 97.26,77.564
  region net GND: 42.17,77.564 41.74,77.564 41.74,77.106 42.17,77.106
  region net GND: 41.17,81.244 40.74,81.244 40.74,80.786 41.17,80.786
  region net GND: 42.17,79.214 41.74,79.214 41.74,78.756 42.17,78.756
  region net GND: 41.17,82.894 40.74,82.894 40.74,82.436 41.17,82.436
  rectangle net GND: 96.83,78.756 97.26,79.214
  rectangle net GND: 95.93,82.436 96.36,82.894
  rectangle net GND: 94.93,107.006 95.36,107.464
  rectangle net GND: 93.93,109.036 94.36,109.494
  rectangle net GND: 93.93,110.686 94.36,111.144
  region net GND: 96.58,108 95.53,108 95.53,104.75 96.58,104.75
  region net GND: 95.58,111.68 94.53,111.68 94.53,108.43 95.58,108.43
  region net GND: 97.58,83.43 96.53,83.43 96.53,80.18 97.58,80.18
  region net GND: 98.48,79.75 97.43,79.75 97.43,76.5 98.48,76.5
  rectangle net GND: 40.52,76.57 41.57,79.82
  rectangle net GND: 45.48,104.07 46.53,107.32
  rectangle net GND: 47.38,109.936 48.15,110.394
  rectangle net GND: 47.38,108.286 48.15,108.744
  rectangle net GND: 46.47,104.56 48.174,105.064
  text "Ścieżka koplanarna (RO4350 0.254 mm): szerokość 0,49 mm / odstęp 0,35 mm" at 215.265,139.319 h1.52

## Silkscreen, mask and mechanical layers (free items; w line width, h text height)
Top Overlay:
  lines w0.55: 63.85,94 63.85,91.15 ccw(c64.85,91.15) 64.85,90.15 72.7,90.15 ccw(c72.7,91.15) 73.7,91.15 73.7,94.05 ccw(c72.7,94.05) 72.7,95.05 67.35,95.05 ; 63.85,94.05 cw(c64.85,94.05) 64.85,95.05
  text "3 mm" at 89,118.45 h1.25
  text "1 mm" at 46.525,117.725 h1.25
  text "VEE" at 77.496,114.254 h1.52 r90
  text "GND" at 81.496,114.254 h1.52 r90
  text "ABPG v 1.0" at 62.054,97.104 h1.52
  text "4 mm" at 88.875,96.05 h1.25
  text "2 mm" at 46.625,95.975 h1.25
  text "ise" at 65.45,90.8 h7
  text "8 mm" at 46.5,90.35 h1.25
  text "5 mm" at 89.1,90.3 h1.25
  text "7 mm" at 46.125,68.5 h1.25
  text "6 mm" at 89,68.5 h1.25
Top Solder:
  lines w0.1: 41.57,78.16 50.39,78.16
  lines w2: 41.175,81.84 50.39,81.84 cw(c50.39,78.774) 52.558,80.942 53.073,80.427 ccw(c53.5,80.854) 53.5,80.25 ; 42.2,78.16 50.39,78.16 ccw(c50.39,81.226) 52.558,79.058 53.073,79.573 cw(c53.5,79.146) 53.5,79.75 ; 47.075,105.66 50.39,105.66 ccw(c50.39,108.726) 52.558,106.558 53.073,107.073 cw(c53.5,106.646) 53.5,107.25 ; 48.125,109.34 50.39,109.34 cw(c50.39,106.274) 52.558,108.442 53.073,107.927 ccw(c53.5,108.354) 53.5,107.75 ; 48.775,73 48.775,77.95 ; 48.775,100.5 48.775,105.45 ; 48.825,82.05 48.825,87 ; 48.825,109.55 48.825,114.5 ; 86.5,79.75 cw(c86.5,79.146) 86.927,79.573 87.442,79.058 ccw(c89.61,81.226) 89.61,78.16 96.875,78.16 ; 86.5,80.25 ccw(c86.5,80.854) 86.927,80.427 87.442,80.942 cw(c89.61,78.774) 89.61,81.84 96,81.84 ; 86.5,108 cw(c86.5,107.396) 86.927,107.823 87.442,107.308 ccw(c89.61,109.476) 89.61,106.41 94.975,106.41 ; 86.5,108.5 ccw(c86.5,109.104) 86.927,108.677 87.442,109.192 cw(c89.61,107.024) 89.61,110.09 93.975,110.09 ; 91.175,73 91.175,77.95 ; 91.175,100.7 91.175,105.65 ; 91.225,82.05 91.225,87 ; 91.225,110.15 91.225,115.1